# EAGLE board regulator (EAGLE ?)
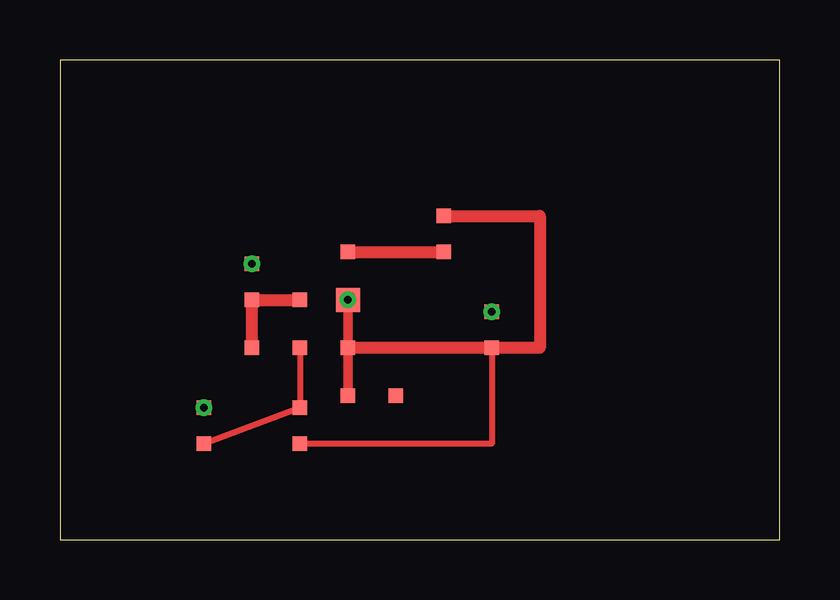
[diagram p0: board, top side]
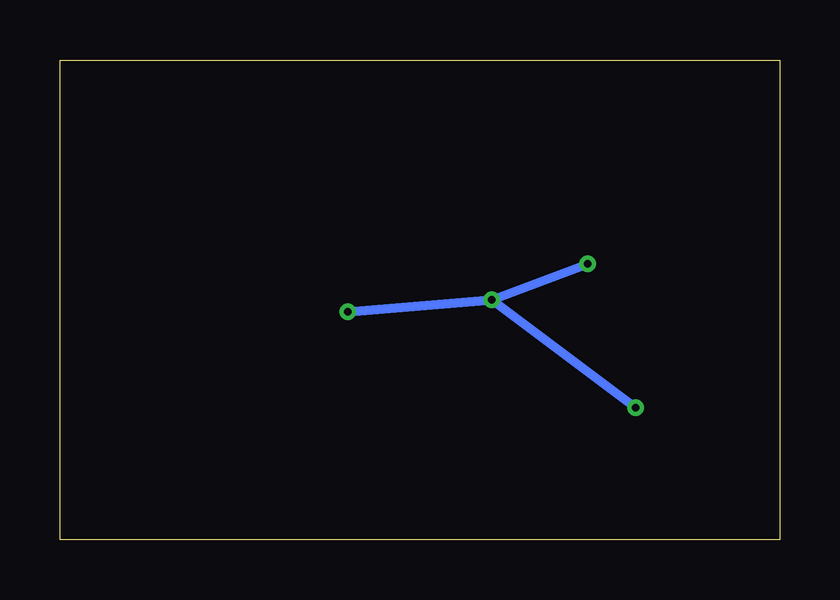
[diagram p1: board, bottom side, seen from below]

Size 30 x 20 mm. Coordinates in mm from the lower left corner, seen from the top.
Outline: 0,0 30,0 30,20 0,20 0,0
Copper layers (1*2*15*16): layer 1 / layer 2 / layer 15 / layer 16

## Footprints (pad centres in the part's own frame; a part is rotated, then mirrored left to right if it is on the bottom)
0805 = smd 0.6 x 0.6: 1 0,0; 2 0,1.5
QFN = smd 0.6 x 0.6: AGND 2,-4; EN -2,-2; FB 0,-2; PG 4,-4; SW 2,2; VIN 0,0; VOS 2,-2 | smd 1 x 1: EP 2,0

## Placement (x,y rotation side)
C1  [0805]  8,10 0 top
C2  22uF  [0805]  18,8 0 top
L1  2.2uH  [0805]  16,12 0 top
R1  100k  [0805]  10,4 0 top
R2  20k  [0805]  6,4 0 top
U1  [QFN]  10,10 0 top

## Library data of the parts
C1 = L; MPN: TEST-CAP
C2 = L; MPN: TEST-OUTPUT-CAP
L1 = L; MPN: TEST-INDUCTOR
R1 = L; MPN: TEST-FB-UPPER
R2 = L; MPN: TEST-FB-LOWER
U1 = L; MPN: TEST-BUCK

## Nets
FB: R1.2 R2.1 U1.FB
GND: C1.2 C2.2 R2.2 U1.AGND U1.EP
SW: L1.1 U1.SW
VIN: C1.1 U1.EN U1.VIN
VOUT: C2.1 L1.2 R1.1 U1.VOS

## Tracks (layer width: path | path; a pad name or v marks a point on that pad's centre or on a via)
FB
  layer 1 0.25: U1.FB R1.2 R2.1
GND  (via drill 0.3 pad 0.6)
  layer 1 0.4: U1.AGND U1.EP
  layer 16 0.4: C1.2 U1.EP | C2.2 U1.EP | R2.2 U1.EP
  other vias: 12,10 8,11.5 18,9.5 6,5.5
SW
  layer 1 0.5: U1.SW L1.1
VIN
  layer 1 0.5: U1.VIN C1.1 U1.EN
VOUT
  layer 1 0.25: C2.1 18,4 R1.1
  layer 1 0.5: L1.2 20,13.5 20,8 C2.1 U1.VOS